# Altium PCB IC Power SimCom.PcbDoc (part 1 of 3)
Units mm, origin at the board's own origin, x right, y up, seen from the top; angles counter-clockwise.
Board outline 110 x 110 mm, 2 copper layers (Top Layer, Bottom Layer); 161 components, 109 nets, 599 pads, 845 vias.
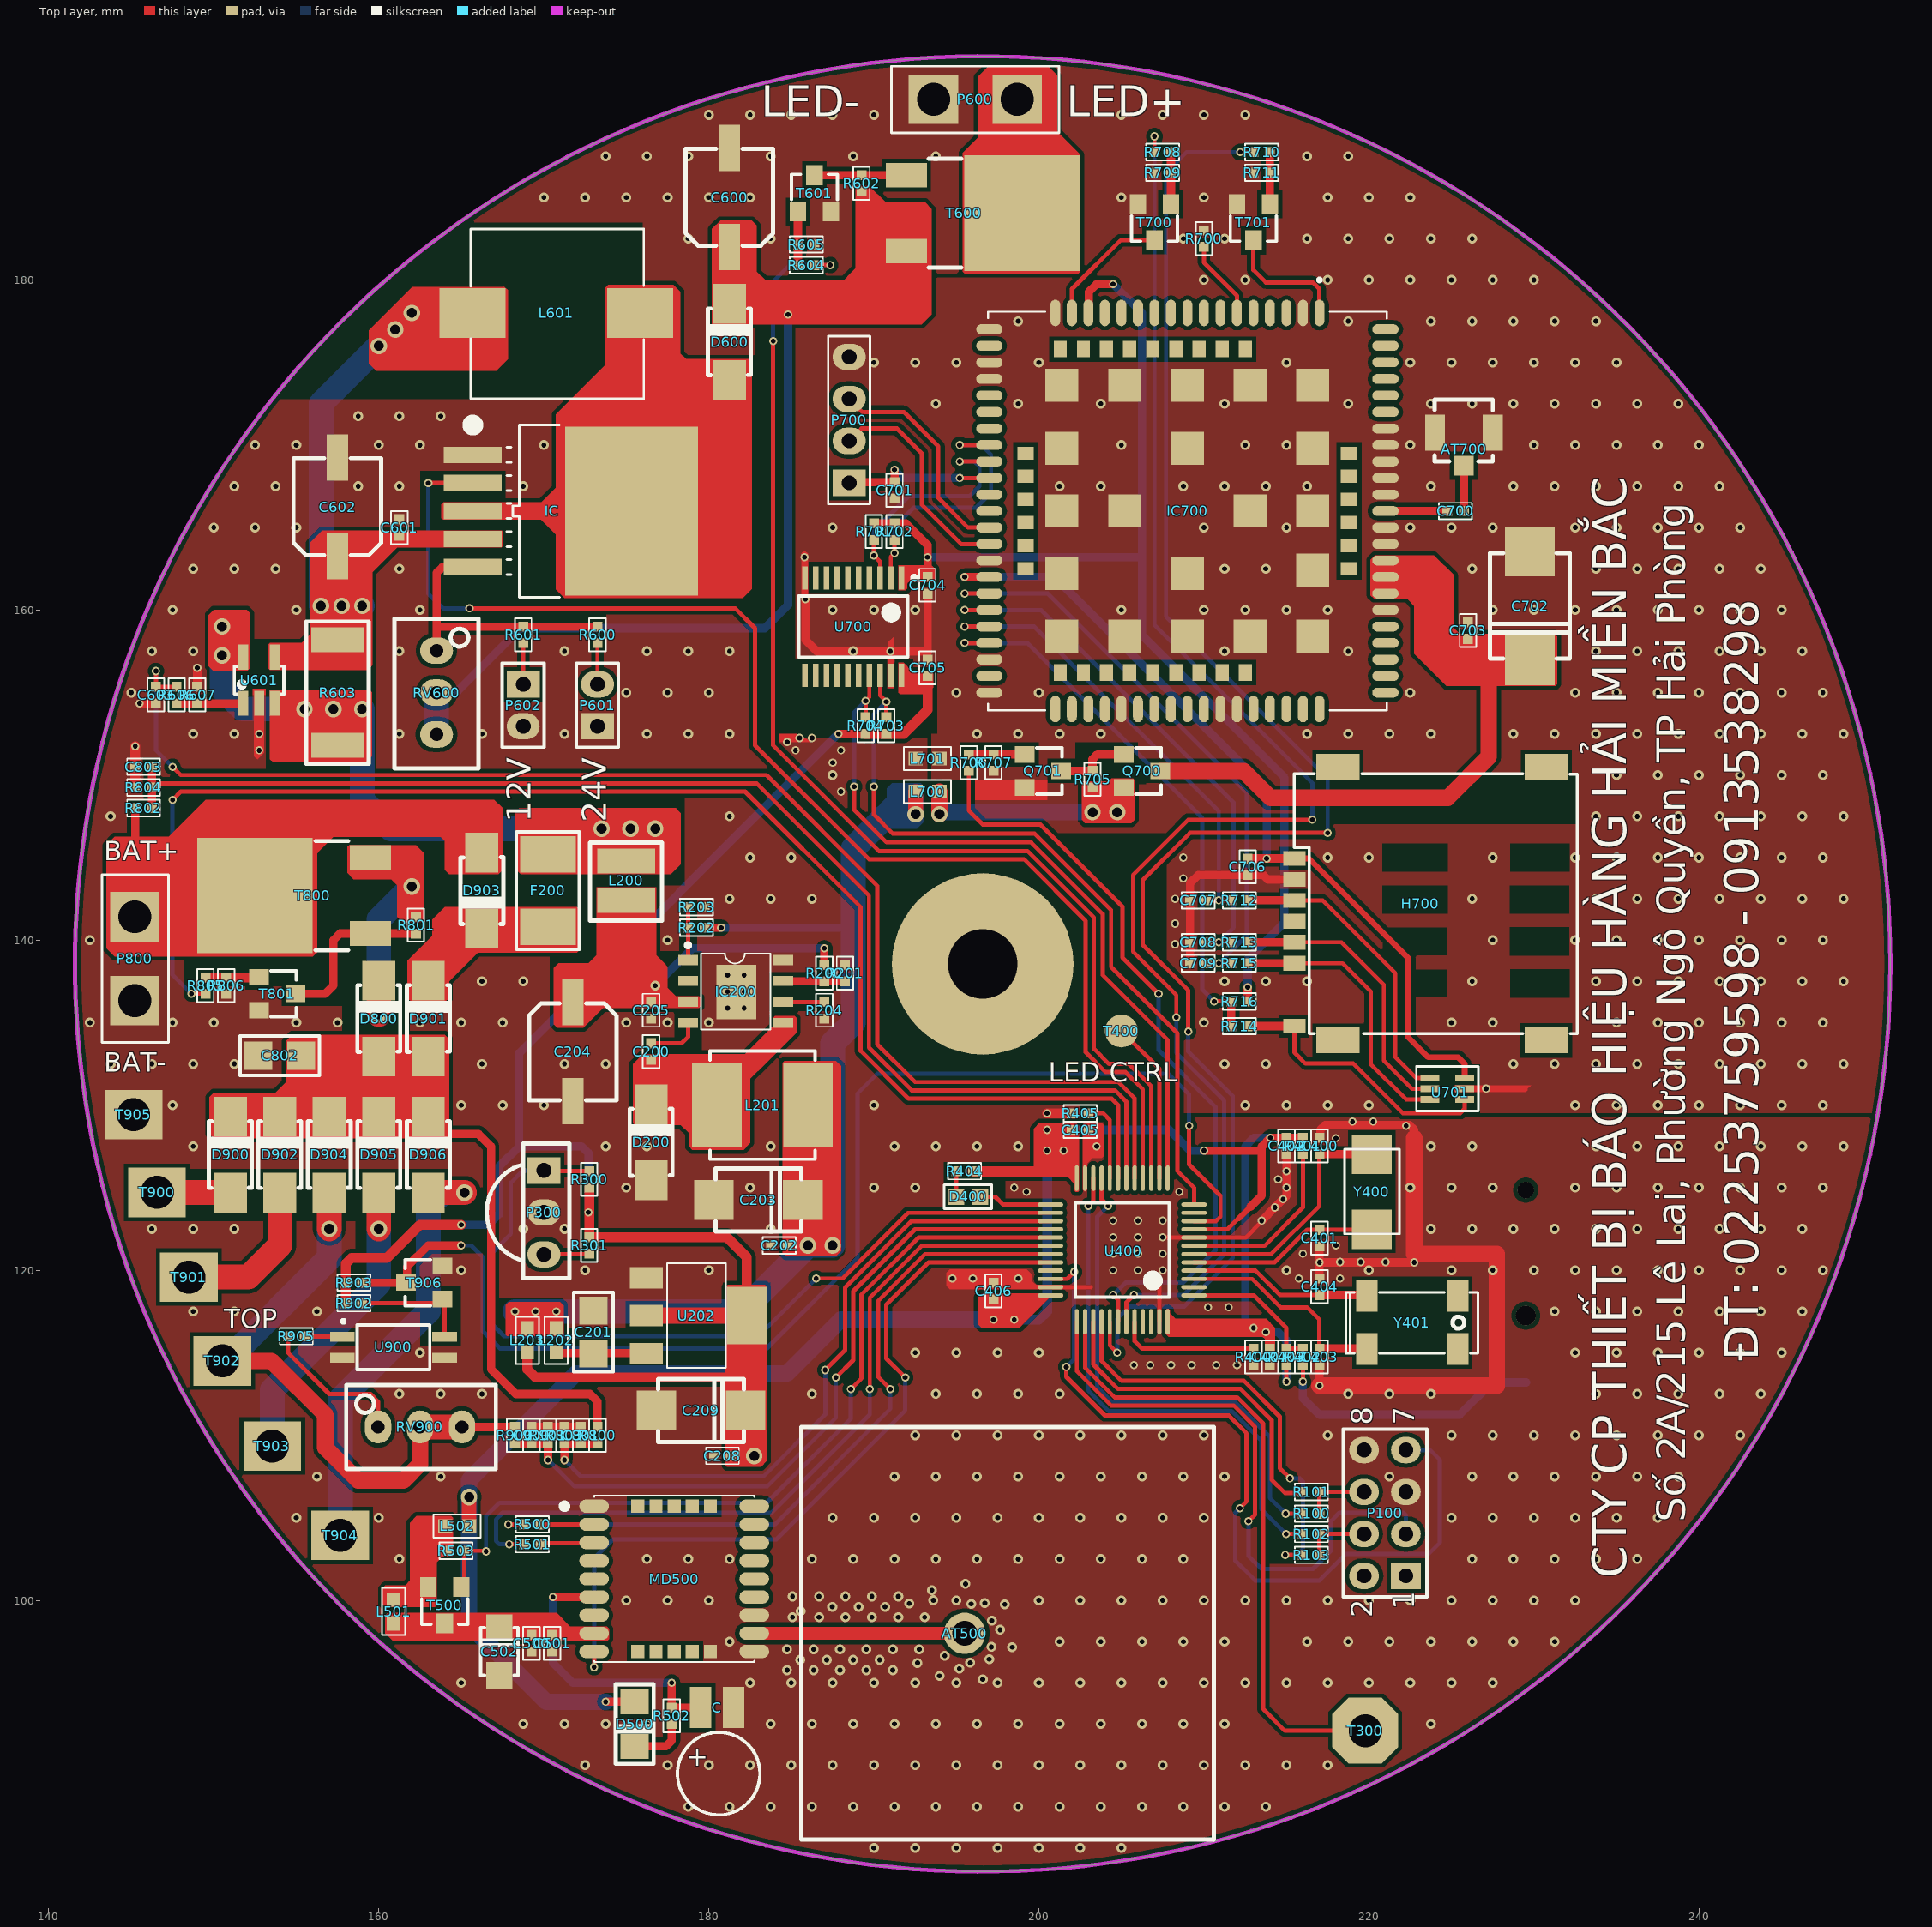
[diagram p0: Top Layer view]
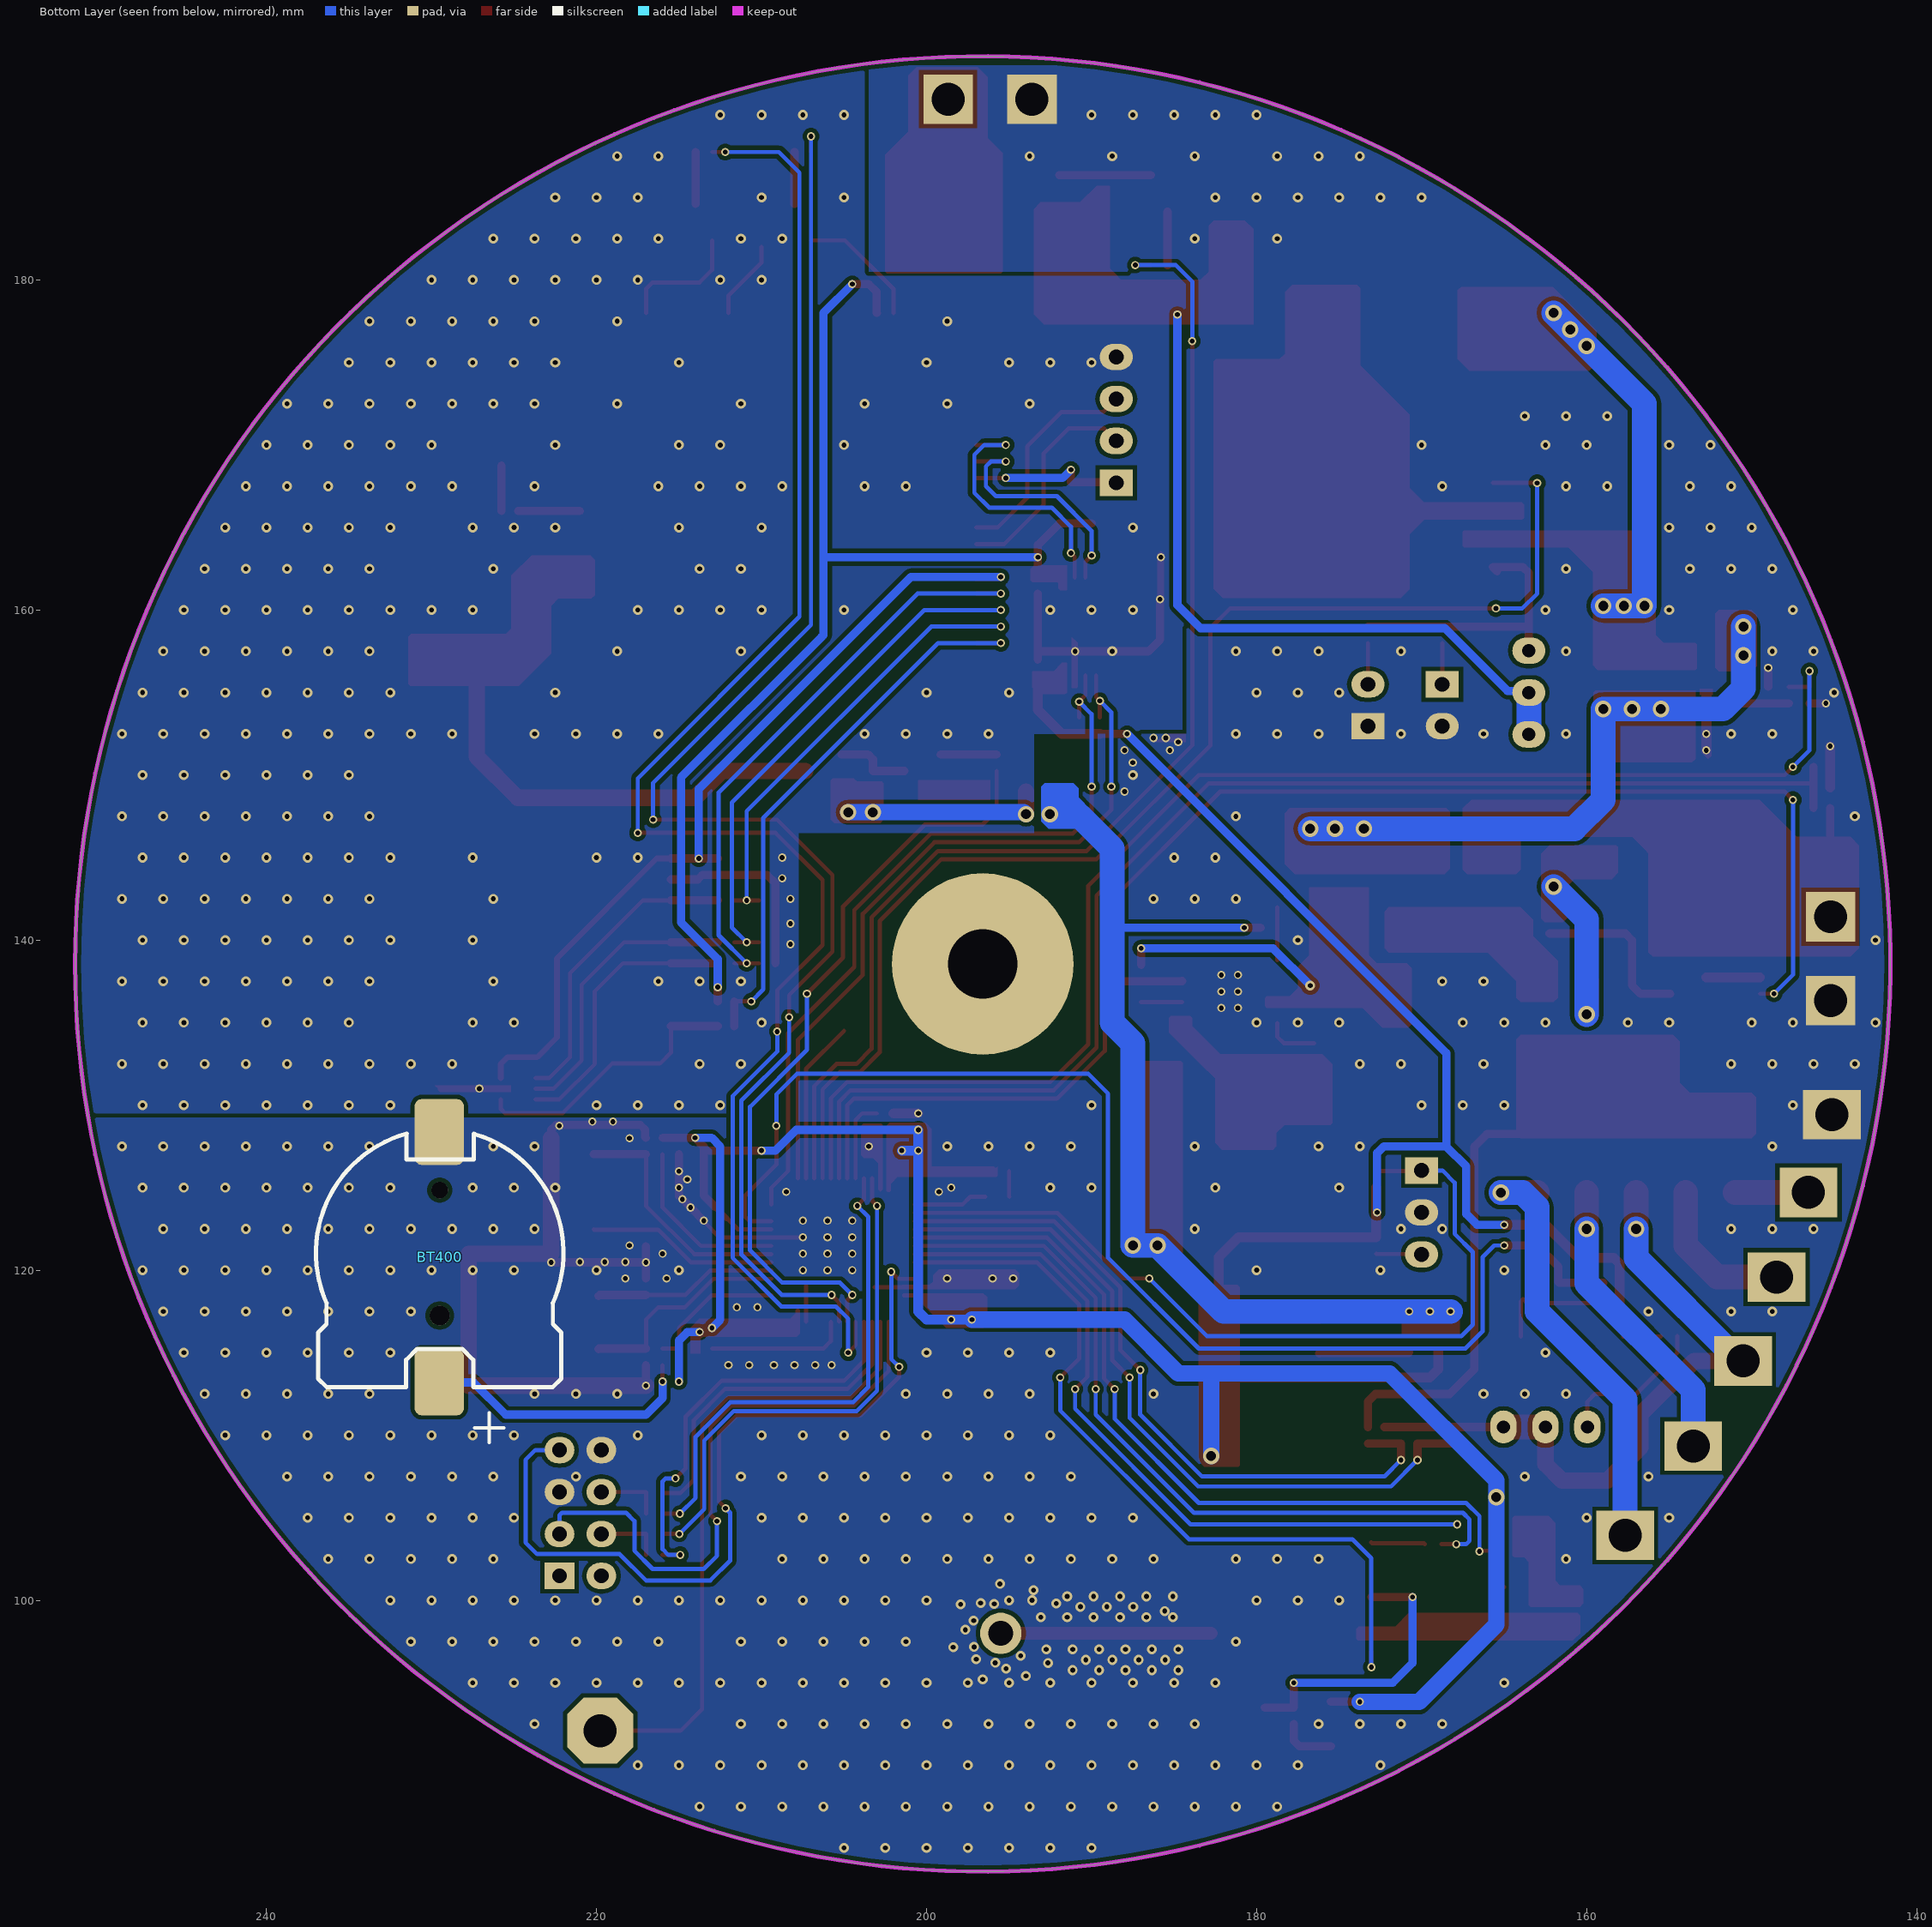
[diagram p1: Bottom Layer view, seen from below]
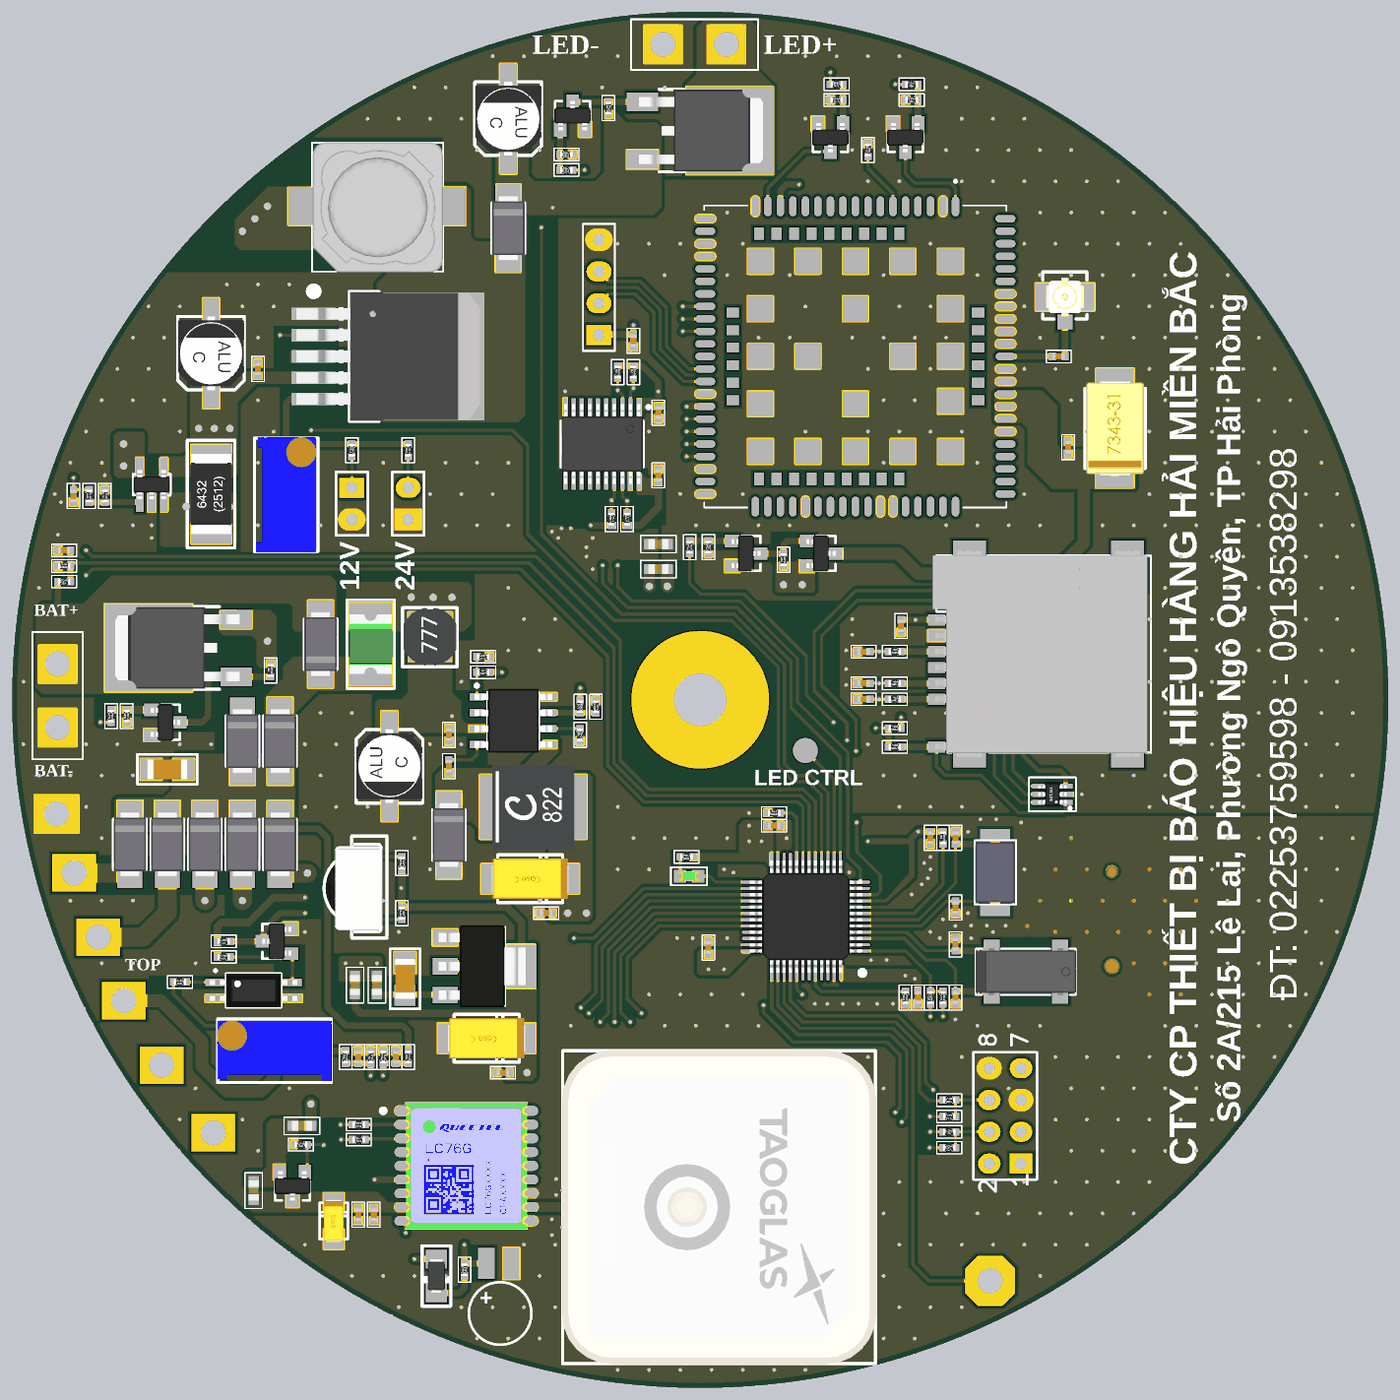
[diagram p3: 3D render of the assembled board from above, using the file's embedded part models]

## Layer stack, top to bottom
Top Solder: solder mask 0.0102, Solder Resist, Dk 3.5
Top Layer: signal copper 0.0356
Dielectric 1: dielectric 0.32, FR-4, Dk 4.8
Bottom Layer: signal copper 0.0356
Bottom Solder: solder mask 0.0102, Solder Resist, Dk 3.5

## Board outline
141.596,138.557 ccw(c196.596,138.557) 196.596,83.557 ccw(c196.596,138.557) 251.596,138.557 ccw(c196.596,138.557) 196.596,193.557 ccw(c196.596,138.557)

## Design rules (kind name [scope] priority, off if disabled: settings)
Clearance [not InComponent('U400','U701')] p1: gap=0.254 ignorepadtopadclearanceinfootprint=FALSE
ComponentClearance [All] p1: gap=0 collisioncheckmode=3 verticalgap=0 showdistances=FALSE
HoleSize [All] p1: absolutevalues=TRUE maxlimit=10 minlimit=0.025 maxpercent=80.000 minpercent=20.000
PlaneConnect [All] p1: planeconnectstyle=Direct reliefexpansion=0.508 reliefentries=4 reliefconductorwidth=0.254 reliefairgap=0.254
PolygonConnect [All] p1: connectstyle=Direct reliefconductorwidth=0.254 reliefentries=4 polygonreliefangle="90 Angle" airgapwidth=0.254
RoutingVias [All] p1: holewidth=0.4 width=8 viastyle="Through Hole" minholewidth=0.3 minwidth=0.6 maxholewidth=0.5 maxwidth=1
SilkToSilkClearance [All] p1: silktosilkclearance=0
SilkToSolderMaskClearance [IsPad] p1: minsilkscreentomaskgap=0 clearancetoexposedcopper=TRUE
SolderMaskExpansion [All] p1: expansion=0.102 istentingtop=FALSE
Width [All] p1: maxlimit=1.5 minlimit=0.254 preferedwidth=0.5
25 further rules are at their usual default settings.

## Classes and differential pairs
net class 50Ohm: NetAT500_1
component class HMS.Bootloader: P100 R100 R101 R102 R103
component class U_HMS.LC76G: AT500 C C500 C501 C502 D500 L501 L502 MD500 R500 R501 R502 R503 T500
component class HMS.LedCtrl: C600 C601 C602 C603 D600 IC L601 P600 P601 P602 R600 R601 R602 R603 R604 R605 R606 R607 RV600 T600 T601 U601
component class HMS.Power: C200 C201 C202 C203 C204 C205 C208 C209 D200 F200 IC200 L200 L201 L202 L203 R200 R201 R202 R203 R204 U202
component class HMS.STM32L151CBT6: BT400 C400 C401 C402 C403 C404 C405 C406 C407 D400 R400 R401 R402 R403 R404 R405 T400 U400 Y400 Y401
component class U_HMS.SIM.A7677S: AT700 C700 C701 C702 C703 C704 C705 C706 C707 C708 C709 H700 IC700 L700 L701 P700 Q700 Q701 R700 R701 R702 R703 R704 R705 R706 R707 R708 R709 R710 R711 R712 R713 R714 R715 R716 T700 T701 U700 U701
component class HMS_NiMHCharge: C801 C802 C803 D800 P800 R800 R801 R802 R803 R804 R805 R806 T800 T801
component class HMS_Solar: C900 D900 D901 D902 D903 D904 D905 D906 R900 R901 R902 R903 R905 RV900 T900 T901 T902 T903 T904 T905 T906 U900
component class HMS.VS1838B: P300 R300 R301 T300

## Components (designator, comment, footprint, x,y, rotation, side; value= is the part's Value field where it differs from the comment)
AT500 "Antenna GPS" "ANT GPS Passive" 195.5,98 r180 top
AT700 "IPEX" "IPEX SMD" 225.75,168.75 r270 top value=NC
BT400 "NC" "DE PIN NHO 3V3" 229.5,121.05 r270 bottom locked
C "NC" SPCAP0.22F 180.5,93.5 r180 top (schematic designator C503)
C200 "104/50V" CAP_CERAMIC_0402(1005) 176.5,133.25 r90 top
C201 "106/50V" CAP_CERAMIC_1206(3216-18) 173,116.25 r270 top
C202 "104/50V" CAP_CERAMIC_0402(1005) 184.275,121.5 r0 top
C203 "107/10V" CAP_TANTAL_2312(6032-28) 183,124.25 r180 top
C204 "10uF/50V" CAP_ALUM_SMD_5054_TYPE_C 171.75,133.25 r90 top
C205 "104/50V" CAP_CERAMIC_0402(1005) 176.5,135.75 r90 top
C208 "104/50V" CAP_CERAMIC_0402(1005) 180.825,108.75 r0 top
C209 "107/10V" CAP_TANTAL_2312(6032-28) 179.525,111.5 r180 top
C400 "20pF/50V" CAP_CERAMIC_0402(1005) 217,127.525 r270 top
C401 "20pF/50V" CAP_CERAMIC_0402(1005) 217,121.95 r90 top
C402 "104/50V" CAP_CERAMIC_0402(1005) 215,127.525 r90 top
C403 "10pF/50V" CAP_CERAMIC_0402(1005) 217,114.75 r90 top
C404 "10pF/50V" CAP_CERAMIC_0402(1005) 217,119 r270 top
C405 "104/50V" CAP_CERAMIC_0402(1005) 202.5,128.5 r180 top
C406 "104/50V" CAP_CERAMIC_0402(1005) 197.25,118.75 r270 top
C407 "104/50V" CAP_CERAMIC_0402(1005) 214,114.75 r90 top
C500 "104/50V" CAP_CERAMIC_0402(1005) 169.25,97.4 r90 top
C501 "10pF/50V" CAP_CERAMIC_0402(1005) 170.5,97.4 r90 top
C502 "107/10V" CAP_TANTAL_1206(3216-18) 167.3,96.9 r270 top
C600 "10uF/50V" CAP_ALUM_SMD_5054_TYPE_C 181.25,185 r270 top
C601 "104/50V" CAP_CERAMIC_0402(1005) 161.25,165 r270 top
C602 "10uF/50V" CAP_ALUM_SMD_5054_TYPE_C 157.5,166.25 r270 top
C603 "104/50V" CAP_CERAMIC_0402(1005) 146.5,154.85 r90 top
C700 "NC" CAP_CERAMIC_0402(1005) 225.25,166 r180 top
C701 "NC" CAP_CERAMIC_0402(1005) 191.25,167.25 r270 top value=104/50V
C702 "NC" CAP_TANTAL_2917(7343-31) 229.75,160.25 r90 top value=477/10V
C703 "NC" CAP_CERAMIC_0402(1005) 226,158.75 r270 top value=104/50V
C704 "NC" CAP_CERAMIC_0402(1005) 193.25,161.5 r90 top
C705 "NC" CAP_CERAMIC_0402(1005) 193.25,156.5 r270 top
C706 "NC" CAP_CERAMIC_0402(1005) 212.65,144.447 r90 top value=104/50V
C707 "NC" CAP_CERAMIC_0402(1005) 209.65,142.407 r0 top value=20pF/50V
C708 "NC" CAP_CERAMIC_0402(1005) 209.65,139.867 r0 top value=20pF/50V
C709 "NC" CAP_CERAMIC_0402(1005) 209.65,138.597 r0 top value=20pF/50V
C801 "104/50V" CAP_CERAMIC_0402(1005) 172.25,110 r270 top
C802 "106/50V" CAP_CERAMIC_1206(3216-18) 154,133 r180 top
C803 "104/50V" CAP_CERAMIC_0402(1005) 145.75,150.5 r0 top
C900 "104/50V" CAP_CERAMIC_0402(1005) 169.25,110 r270 top
D200 "SS34" DO214AC_SMA_1808 176.5,127.75 r90 top
D400 "LED Red" LED_0603_GREEN 195.7,124.45 r0 top
D500 "1N4148W" DIODE_F03_1005 175.5,92.5 r270 top
D600 "SS54" DO214AC_SMA_1808 181.25,176.25 r90 top
D800 "SS34" DO214AC_SMA_1808 160,135.25 r90 top
D900 "SS34" DO214AC_SMA_1808 151,127 r90 top
D901 "SS34" DO214AC_SMA_1808 163,135.25 r90 top
D902 "SS34" DO214AC_SMA_1808 154,127 r90 top
D903 "SS34" DO214AC_SMA_1808 166.25,143 r270 top
D904 "SS34" DO214AC_SMA_1808 157,127 r90 top
D905 "SS34" DO214AC_SMA_1808 160,127 r90 top
D906 "SS34" DO214AC_SMA_1808 163,127 r90 top
F200 "1A/33V" MF-MSMF 170.25,143 r90 top
H700 "NC" MUP-C792 223.116,142.212 r90 top value=MUP-C792
IC "XL6019E1" TO-263-5 170.5,166 r270 top
IC200 "RY81020BP8" ESOP-8 181.633,136.885 r270 top
IC700 "NC" SIM_A7677S 209,166 r270 top locked
L200 "3.3uH" L2.1A_3.5_3.3 175,143.6 r180 top
L201 "33uH" L3A_7x7x3mm 183.25,130 r0 top
L202 "FBMJ1608HM230NT" Inductor_0603 170.75,115.75 r270 top
L203 "FBMJ1608HM230NT" Inductor_0603 169,115.75 r270 top
L501 "4A/23Ohm" Inductor_0603 160.9,99.323 r270 top
L502 "NC" Inductor_0603 164.75,104.5 r180 top
L601 "4.7uH" L3A_10x10x4mm 170.75,178 r0 top
L700 "NC" Inductor_0603 193.25,149 r0 top
L701 "NC" Inductor_0603 193.25,151 r0 top
MD500 "LC76G" LC76G_GPS 173.05,105.7 r0 top
P100 "Header 4X2" HDR2X4 222.24,101.48 r90 top
P300 "VS1838B" IR_RECEIVER 170,123.5 r270 top
P600 "NC" H2_BIG 196.15,190.95 r180 top
P601 "24V" HDR1X2 173.25,154.23 r90 top
P602 "12V" HDR1X2 168.75,154.23 r270 top
P700 "NC" HDR1X4 188.5,171.52 r90 top
P800 "NC" H2_BIG 145.225,138.875 r270 top
Q700 "NC" SOT23-3 206.25,150.25 r270 top value="20 V 4A"
Q701 "NC" SOT23-3 200.25,150.25 r270 top value="0.15A 60V SOT-23"
R100 "1K" RES_0402(1005) 216.5,105.25 r180 top
R101 "NC" RES_0402(1005) 216.5,106.56 r180 top
R102 "1K" RES_0402(1005) 216.5,104.02 r180 top
R103 "NC" RES_0402(1005) 216.5,102.75 r180 top
R200 "NC" RES_0402(1005) 187,138 r90 top
R201 "NC" RES_0402(1005) 188.25,138 r270 top
R202 "20K" RES_0402(1005) 179.25,140.75 r0 top
R203 "5.1K" RES_0402(1005) 179.25,142 r180 top
R204 "NC" RES_0402(1005) 187,135.75 r90 top
R300 "10K" RES_0402(1005) 172.75,125.5 r270 top
R301 "100R" RES_0402(1005) 172.75,121.5 r270 top
R400 "100K" RES_0402(1005) 213,114.75 r90 top
R401 "100K" RES_0402(1005) 216,127.525 r90 top
R402 "NC" RES_0402(1005) 216,114.75 r90 top
R403 "0R" RES_0402(1005) 215,114.75 r90 top
R404 "1K" RES_0402(1005) 195.5,126 r180 top
R405 "100K" RES_0402(1005) 202.5,129.5 r0 top
R500 "1K" RES_0402(1005) 169.3,104.6 r180 top
R501 "1K" RES_0402(1005) 169.3,103.4 r180 top
R502 "100R" RES_0402(1005) 177.75,93 r270 top
R503 "10K" RES_0402(1005) 164.675,103 r180 top
R600 "5.1K" RES_0402(1005) 173.25,158.5 r90 top
R601 "10K" RES_0402(1005) 168.75,158.5 r90 top
R602 "10K" RES_0402(1005) 189.25,185.85 r270 top
R603 "0.1R" RES_2512 157.5,155 r90 top
R604 "1K" RES_0402(1005) 185.9,180.9 r180 top
R605 "10K" RES_0402(1005) 185.9,182.15 r180 top
R606 "330R" RES_0402(1005) 147.75,154.85 r90 top
R607 "100K" RES_0402(1005) 149,154.85 r270 top
R700 "NC" RES_0402(1005) 210,182.5 r270 top value=1K
R701 "NC" RES_0402(1005) 190,164.75 r90 top value=2K2
R702 "NC" RES_0402(1005) 191.25,164.75 r90 top value=2K2
R703 "NC" RES_0402(1005) 190.75,153 r270 top value=2K2
R704 "NC" RES_0402(1005) 189.5,153 r270 top value=2K2
R705 "NC" RES_0402(1005) 203.25,149.75 r90 top
R706 "NC" RES_0402(1005) 195.75,150.75 r270 top
R707 "NC" RES_0402(1005) 197.25,150.75 r270 top
R708 "NC" RES_0402(1005) 207.5,187.75 r180 top
R709 "NC" RES_0402(1005) 207.5,186.5 r180 top
R710 "NC" RES_0402(1005) 213.5,187.75 r180 top
R711 "NC" RES_0402(1005) 213.5,186.5 r180 top
R712 "NC" RES_0402(1005) 212.15,142.407 r0 top value=0R
R713 "NC" RES_0402(1005) 212.15,139.867 r0 top value=0R
R714 "NC" RES_0402(1005) 212.15,134.787 r0 top value=0R
R715 "NC" RES_0402(1005) 212.15,138.597 r0 top value=0R
R716 "NC" RES_0402(1005) 212.15,136.287 r0 top value=4.7K
R800 "100K" RES_0402(1005) 173.25,110 r90 top
R801 "10K" RES_0402(1005) 162.25,140.9 r90 top
R802 "100K" RES_0402(1005) 145.75,148 r180 top
R803 "10K" RES_0402(1005) 171.25,110 r270 top
R804 "10K" RES_0402(1005) 145.75,149.25 r0 top
R805 "1K" RES_0402(1005) 149.5,137.25 r90 top
R806 "10K" RES_0402(1005) 150.75,137.25 r90 top
R900 "100K" RES_0402(1005) 168.25,110 r90 top
R901 "10K" RES_0402(1005) 170.25,110 r270 top
R902 "10K" RES_0402(1005) 158.5,118 r180 top
R903 "10K" RES_0402(1005) 158.5,119.25 r180 top
R905 "10K" RES_0402(1005) 155,116 r180 top
RV600 "204" RES_VAR_Type1 163.5,155 r270 top
RV900 "104" RES_VAR_Type1 162.5,110.5 r0 top
T300 "Test Point" TP 219.775,92.1 r0 top
T400 "Test Point" "Test Point SMD" 205,134.5 r90 top
T500 "A03415" SOT23-3 164,99.7 r180 top value=AO3415
T600 "AOD409" TO252 197.5,184.05 r270 top
T601 "C1815" SOT23-3 186.4,185.25 r0 top
T700 "NC" SOT23-3 207,183.5 r180 top value="0.15A 60V SOT-23"
T701 "NC" SOT23-3 213,183.5 r180 top value="0.15A 60V SOT-23"
T800 "AOD409" TO252 153.968,142.7 r90 top
T801 "C1815" SOT23-3 153.85,136.75 r270 top
T900 "Test Point" TP_2 146.558,124.714 r180 top
T901 "Test Point" TP_2 148.488,119.583 r180 top
T902 "Test Point" TP_2 150.52,114.503 r180 top
T903 "Test Point" TP_2 153.543,109.347 r180 top
T904 "Test Point" TP_2 157.671,103.937 r180 top
T905 "Test Point" TP_2 145.15,129.425 r180 top
T906 "2N7002,215" SOT23-3 162.75,119.25 r90 top value="60V 300mA"
U202 "LM1117-ADJ" LM1117-SOP 179.25,117.25 r270 top value=3.3V
U400 "STM32L151CBT6" LQFP48_L 205.05,121.225 r180 top
U601 "INA138" SOT23-5 152.75,155.75 r0 top
U700 "NC" TSOP65P640X120-20N 188.75,159 r270 top
U701 "NC" SOT65P210X140-6N 224.75,131 r180 top
U900 "EL817" "Opto small" 161.25,115.5 r0 top value="60V 50mA"
Y400 "8Mhz" CRYSTAL_SMD_2PIN-5032 220.175,124.75 r90 top
Y401 "32.768KHz" ABS25-32768-6-T 222.625,116.825 r0 top

## Footprints (in the part's own frame and the unit in brackets; to place one, negate y for a bottom-side part, rotate by r counter-clockwise, add the part's x,y. Pads: shape width x height; smd on the part's side, far side on the other; paste and mask are expansions set on the pad)
ABS25-32768-6-T [mm] "CRYSTAL 32.768KHZ 6PF SMD"
  rect 1.3x1.9 smd: 1(-2.75,-1.6) 2(2.75,-1.6) 3(2.75,1.6) 4(-2.75,1.6)
  silkscreen extent -4.02,-1.85 3.98,1.83, body extent -4,-1.9 4,1.9, height 2.53
"ANT GPS Passive" [mm]
  round 2.5 hole 1.5: 1(0,0)
  silkscreen extent -15.1,-12.5 9.9,12.5, body extent -15.15,-12.55 9.95,12.55, height 4.73
CAP_ALUM_SMD_5054_TYPE_C [mm]
  rect 2.8x1.3 smd: 1(3,0) 2(-3,0)
  silkscreen extent -2.95,-2.67 2.92,2.65, body extent -2.95,-2.65 2.95,2.65, height 5.41
CAP_CERAMIC_0402(1005) [mm] "Chip Inductor, Body 1.0x0.5mm, IPC High Density"
  rect 0.6x0.6 smd: 1(-0.5,0) 2(0.5,0)
  silkscreen extent -1,-0.5 1,0.5, body extent -0.5,-0.25 0.5,0.25, height 0.5
CAP_CERAMIC_1206(3216-18) [mm] "Chip Capacitor, Body 3.2x1.6mm, IPC High Density"
  rect 1.7x1.7 smd: 1(-1.3,0) 2(1.3,0)
  silkscreen extent -2.4,-1.2 2.4,1.2, body extent -1.6,-0.8 1.6,0.8, height 1
CAP_TANTAL_1206(3216-18) [mm] "Chip Capacitor, Body 3.2x1.6mm, IPC High Density"
  rect 1.6x1.6 smd: 1(-1.45,0) 2(1.45,0)
  silkscreen extent -1.45,-1.12 1.45,1.12, body extent -1.7,-0.8 1.7,0.8, height 1.65
CAP_TANTAL_2312(6032-28) [mm] "Chip Resistor, Body 6.0x3.2mm, IPC High Density"
  rect 2.4x2.4 smd: 1(-2.7,0) 2(2.7,0)
  silkscreen extent -2.6,-1.91 2.6,1.91, body extent -3.09,-1.6 3.09,1.6, height 2.69
CAP_TANTAL_2917(7343-31) [mm] "Chip Resistor, Body 6.0x3.2mm, IPC High Density"
  rect 3x3 smd: 1(-3.3,0) 2(3.3,0)
  silkscreen extent -3.2,-2.41 3.2,2.41, body extent -3.8,-2.3 3.8,2.3, height 3.1
CRYSTAL_SMD_2PIN-5032 [mm] "Crystal smd"
  rect 2.4x2.4 smd mask+0.025: 1(-2.275,0) 2(2.275,0)
  silkscreen extent -2.55,-1.67 2.58,1.65, body extent -2.5,-1.6 2.5,1.6, height 1.3
"DE PIN NHO 3V3" [mm]
  rrect30% 4x3 smd mask+0.051: 1(7.85,-0.025) 2(-7.325,-0.025)
  round 1 hole 1 unplated paste+0 mask+0: ""(-3.8,0)
  round 1.2 hole 1.2 unplated mask+0: ""(3.8,0)
  silkscreen extent -7.23,-7.5 11.5,7.5, body extent -9,-7.5 9.5,7.49, height 3.92
DIODE_F03_1005 [mm]
  rect 1.5x1.7 smd: 1(-1.35,0) 2(1.35,0)
  silkscreen extent -2.4,-1.14 2.41,1.16, body extent -1.35,-0.7 1.35,0.7, height 0.73
DO214AC_SMA_1808 [mm] "Diode B340, Diode M7"
  rect 2.4x2 smd: 1(-2.3,0) 2(2.3,0)
  silkscreen extent -2.02,-1.3 2.02,1.3, body extent -2.6,-1.3 2.6,1.3, height 2.42
ESOP-8 [mm]
  rect 0.6x1.2 smd: 1(-1.905,-2.883) 2(-0.635,-2.883) 3(0.635,-2.883) 4(1.905,-2.883) 5(1.905,2.884) 6(0.635,2.884) 7(-0.635,2.884) 8(-1.905,2.884)
  rect 3.3x2.4 smd: 9(0.035,0.034)
  silkscreen extent -2.9,-3 2.3,2.1, body extent -2.54,-3.07 2.56,3.13, height 1.56
H2_BIG [mm] "Euro Block"
  rect 3x3 hole 2: 1(-2.54,0) 2(2.54,0)
  silkscreen extent -5.08,-2 5.08,2.03, body extent -3.81,-1.27 3.81,1.27, height 1.5
HDR1X2 [mm] "Connector; Header; 2 Position"
  rect 1.6x2 hole 0.9: 1(-1.27,0)
  oval 1.6x2 hole 0.9: 2(1.27,0)
  silkscreen extent -2.54,-1.27 2.54,1.27, body extent -2.54,-1.27 2.54,1.27, height 7
HDR1X4 [mm] "Connector; Header; 4 Position"
  rect 1.6x2 hole 0.9: 1(-3.81,0)
  oval 1.6x2 hole 0.9: 2(-1.27,0) 3(1.27,0) 4(3.81,0)
  silkscreen extent -5.08,-1.27 5.08,1.27, body extent -5.08,-1.27 5.08,1.27, height 7
HDR2X4 [mm] "Connector; Header; 4x2 Position"
  rect 1.6x1.8 hole 0.9: 1(0,0)
  oval 1.6x1.8 hole 0.9: 2(0,2.54) 3(2.54,0) 4(2.54,2.54) 5(5.08,0) 6(5.08,2.54) 7(7.62,0) 8(7.62,2.54)
  silkscreen extent -1.27,-1.27 8.89,3.81, body extent -1.27,-1.27 8.89,3.81, height 7
Inductor_0603 [mil] "HK1608R22J-T"
  rect 34x32 smd paste+0 mask+0: 1(-28.54,0) 2(28.46,0)
  silkscreen extent -56,-28 56,28, body extent -32,-16 31,16, height 37
"IPEX SMD" [mm] "IPEX Connector SMD"
  rect 1.2x1.2 smd: 1(0,0)
  rect 2.2x1.2 smd: 2(-2,1.75) 2(-2,-1.75)
  silkscreen extent -4,-1.78 -0.25,1.75, body extent -3.55,-1.5 -0.45,1.5, height 1.25
IR_RECEIVER [mm] "TO, Flat Index; 3 In-Line, Axial Leads; Body Dia. 4.8mm; Leads 0.55 x 0.51 mm (max)"
  rect 1.6x2 hole 0.9: 1(-2.54,0)
  oval 1.6x2 hole 0.9: 2(0,0) 3(2.54,0)
  silkscreen extent -4.17,-3.46 3.99,1.55, body extent -3.62,-3.6 3.62,1.2, height 8.8
L2.1A_3.5_3.3 [mm]
  rect 3.5x1.5 smd: 1(0,-1.2) 2(0,1.2)
  silkscreen extent -2.16,-2.31 2.21,2.41, body extent -2.1,-2.31 2.1,2.31, height 3.47
L3A_7x7x3mm [mm]
  rect 3x5.12 smd: 1(-2.764,0) 2(2.764,0)
  silkscreen extent -3.18,-3.28 3.18,3.28, body extent -3.28,-3.38 3.28,3.38, height 6.1
L3A_10x10x4mm [mm]
  rect 4x3 smd: 1(-5.08,0) 2(5.08,0)
  silkscreen extent -5.18,-5.21 5.31,5.08, body extent -5.12,-5.28 5.28,5.12, height 6.25
LC76G_GPS [mm] "Modlue GNSS"
  rrect100% 1.8x0.8 smd mask+0.05: 1(0,0) 2(0,-1.1) 3(0,-2.2) 4(0,-3.3) 5(0,-4.4) 6(0,-5.5) 7(0,-6.6) 8(0,-7.7) 9(0,-8.8) 10(9.7,-8.8) 11(9.7,-7.7) 12(9.7,-6.6) 13(9.7,-5.5) 14(9.7,-4.4) 15(9.7,-3.3) 16(9.7,-2.2) 17(9.7,-1.1) 18(9.7,0)
  rect 0.8x0.8 smd mask+0.05: 19(7.05,0) 20(5.95,0) 21(4.85,0) 22(3.75,0) 23(2.65,0) 24(2.65,-8.8) 25(3.75,-8.8) 26(4.85,-8.8) 27(5.95,-8.8) 28(7.05,-8.8)
  silkscreen extent -1.9,-9.45 9.7,0.65, body extent 0,-9.45 9.7,0.65, height 2.4
LED_0603_GREEN [mm] "Chip Capacitor, Body 1.6x0.8mm, IPC High Density"
  rect 1x1 smd: 1(-0.725,0) 2(0.725,0)
  silkscreen extent -1.45,-0.73 1.45,0.72, body extent -0.8,-0.4 0.8,0.4, height 0.6
LM1117-SOP [mm]
  rect 1.3x2 smd: 1(-2.3,-3.048) 2(0,-3.048) 3(2.3,-3.048)
  rect 3.5x2.4 smd: 2(0,3.048)
  silkscreen extent -3.18,-1.78 3.18,1.78, body extent -3.25,-3.56 3.25,3.4, height 1.68
LQFP48_L [mm] "Thin QFP, 48-Leads, Body 7x7mm, Pitch 0.5mm, IPC High Density"
  round 0.8 on Top Overlay: 0(-4.5,4.5)
  oval 1.55x0.25 smd: 1(-4.35,2.75) 2(-4.35,2.25) 3(-4.35,1.75) 4(-4.35,1.25) 5(-4.35,0.75) 6(-4.35,0.25) 7(-4.35,-0.25) 8(-4.35,-0.75) 9(-4.35,-1.25) 10(-4.35,-1.75) 11(-4.35,-2.25) 12(-4.35,-2.75) 25(4.35,-2.75) 26(4.35,-2.25) 27(4.35,-1.75) 28(4.35,-1.25) 29(4.35,-0.75) 30(4.35,-0.25) 31(4.35,0.25) 32(4.35,0.75) 33(4.35,1.25) 34(4.35,1.75) 35(4.35,2.25) 36(4.35,2.75)
  oval 0.25x1.55 smd: 13(-2.75,-4.35) 14(-2.25,-4.35) 15(-1.75,-4.35) 16(-1.25,-4.35) 17(-0.75,-4.35) 18(-0.25,-4.35) 19(0.25,-4.35) 20(0.75,-4.35) 21(1.25,-4.35) 22(1.75,-4.35) 23(2.25,-4.35) 24(2.75,-4.35) 37(2.75,4.35) 38(2.25,4.35) 39(1.75,4.35) 40(1.25,4.35) 41(0.75,4.35) 42(0.25,4.35) 43(-0.25,4.35) 44(-0.75,4.35) 45(-1.25,4.35) 46(-1.75,4.35) 47(-2.25,4.35) 48(-2.75,4.35)
  silkscreen extent -2.85,-2.85 2.85,2.85, body extent -4.5,-4.5 4.5,4.5, height 1.6
MF-MSMF [mm]
  rect 2.2x3.4 smd: 1(-2.2,0) 2(2.2,0)
  silkscreen extent -3.56,-1.91 3.56,1.91, body extent -2.36,-1.74 2.37,1.74, height 1.03
MUP-C792 [mm]
  rect 0.9x1.35 smd: 1(2.735,7.634) 2(0.195,7.634) 3(-2.345,7.634) 5(1.465,7.634) 6(-1.075,7.634) 7(-3.615,7.634) 8(-7.425,7.634)
  rect 1.56x2.61 smd: MP(-8.288,-7.634) MP(-8.288,4.996) MP(8.288,-7.634) MP(8.288,4.996)
  Top Layer pour cut-out: -3.147,-9.017 -3.147,-5.436 -1.445,-5.436 -1.445,-9.017
  Top Layer pour cut-out: -0.607,-9.017 -0.607,-5.436 1.095,-5.436 1.095,-9.017
  Top Layer pour cut-out: 1.933,-9.042 1.933,-5.461 3.635,-5.461 3.635,-9.042
  Top Layer pour cut-out: -5.69,-9.042 -5.69,-5.461 -3.988,-5.461 -3.988,-9.042
  Top Layer pour cut-out: -5.69,-1.651 -5.69,2.286 -3.988,2.286 -3.988,-1.651
  Top Layer pour cut-out: -3.147,-1.651 -3.147,2.286 -1.445,2.286 -1.445,-1.651
  Top Layer pour cut-out: -0.607,-1.651 -0.607,2.286 1.095,2.286 1.095,-1.651
  Top Layer pour cut-out: 1.933,-1.651 1.933,2.286 3.635,2.286 3.635,-1.651
  Top Layer pour cut-out: 4.801,-9.449 4.801,7.569 7.866,7.569 7.866,-9.449
  silkscreen extent -7.87,-9.51 7.87,7.65, body extent -8.26,-9.22 8.25,7.95, height 1.5
"Opto small" [mm]
  rect 1.5x0.6 smd: 1(-3.454,0.468) 2(-3.454,-0.802) 3(2.746,-0.802) 4(2.746,0.468)
  silkscreen extent -3.5,-1.53 1.85,1.5, body extent -3.85,-1.53 3.15,1.17, height 2.01
RES_0402(1005) [mm] "Chip Inductor, Body 1.0x0.5mm, IPC High Density"
  rect 0.6x0.6 smd: 1(-0.5,0) 2(0.5,0)
  silkscreen extent -1,-0.5 1,0.5, body extent -0.5,-0.25 0.5,0.25, height 0.35
RES_2512 [mm]
  rect 1.5x3.2 smd: 1(-3.2,0) 2(3.2,0)
  silkscreen extent -4.3,-1.9 4.3,1.9, body extent -3.2,-1.6 3.2,1.6, height 0.6
RES_VAR_Type1 [mm] "Bien tro vi chinh"
  oval 1.6x2 hole 0.8: 1(-2.54,0) 2(0,0) 3(2.54,0)
  silkscreen extent -4.47,-2.54 4.6,2.54, body extent -4.54,-2.4 4.66,2.4, height 12.02
SIM_A7677S [mm]
  oval 1.6x0.6 smd: 1(-12,8) 2(-12,7) 3(-12,6) 4(-12,5) 5(-12,4) 6(-12,3) 7(-12,2) 8(-12,1) 9(-12,0) 10(-12,-1) 11(-12,-2) 12(-12,-3) 13(-12,-4) 14(-12,-5) 15(-12,-6) 16(-12,-7) 17(-12,-8) 35(12,-8) 36(12,-7) 37(12,-6) 38(12,-5) 39(12,-4) 40(12,-3) 41(12,-2) 42(12,-1) 43(12,0) 44(12,1) 45(12,2) 46(12,3) 47(12,4) 48(12,5) 49(12,6) 50(12,7) 51(12,8)
  oval 0.6x1.6 smd: 18(-8,-12) 19(-7,-12) 20(-6,-12) 21(-5,-12) 22(-4,-12) 23(-3,-12) 24(-2,-12) 25(-1,-12) 26(0,-12) 27(1,-12) 28(2,-12) 29(3,-12) 30(4,-12) 31(5,-12) 32(6,-12) 33(7,-12) 34(8,-12) 52(8,12) 53(7,12) 54(6,12) 55(5,12) 56(4,12) 57(3,12) 58(2,12) 59(1,12) 60(0,12) 61(-1,12) 62(-2,12) 63(-3,12) 64(-4,12) 65(-5,12) 66(-6,12) 67(-7,12) 68(-8,12) 89(-11.01,-12) 90(-10.01,-12) 91(-9,-12) 92(9,-12) 93(10,-12) 94(11,-12) 95(11,12) 96(10,12) 97(9,12) 98(-9.01,12) 99(-10.01,12) 100(-11.01,12)
  rect 2x2 smd: 69(-7.611,7.6) 70(-7.611,3.8) 71(-7.611,0) 72(-7.611,-3.8) 73(-7.611,-7.6) 74(-3.811,-7.6) 75(-0.011,-7.6) 76(3.789,-7.6) 77(7.589,-7.6) 78(7.589,-3.8) 79(7.589,0) 80(7.589,3.8) 81(7.589,7.6) 82(3.589,7.6) 83(-0.011,7.6) 84(-3.811,7.6) 85(-3.811,0) 86(-0.011,-3.8) 87(3.789,0) 88(-0.011,3.8)
  rect 1x0.8 smd: 101(-9.81,3.5) 102(-9.81,2.1) 103(-9.81,0.7) 104(-9.81,-0.7) 105(-9.81,-2.1) 106(-9.81,-3.5) 113(9.79,-3.5) 114(9.79,-2.1) 115(9.79,-0.7) 116(9.79,0.7) 117(9.79,2.1) 118(9.79,3.5) 125(-9.81,-4.9) 126(-9.81,-6.3) 127(-9.81,-7.7) 128(9.79,-7.7) 129(9.79,-6.3) 130(9.79,-4.9)
  rect 0.8x1 smd: 107(-3.5,-9.8) 108(-2.1,-9.8) 109(-0.7,-9.8) 110(0.7,-9.8) 111(2.1,-9.8) 112(3.5,-9.8) 119(3.5,9.8) 120(2.1,9.8) 121(0.7,9.8) 122(-0.7,9.8) 123(-2.1,9.8) 124(-3.5,9.8)
  silkscreen extent -14.1,-12.07 12.08,12.08, body extent -12.04,-11.94 12.01,12.09, height 1.2
SOT23-3 [mm]
  round 0.5 on Top Overlay: 1(-1.016,0)
  rect 1x1.2 smd: 1(-1,-1.1) 2(1,-1.1) 3(0,1.1)
  silkscreen extent -1.4,-0.38 1.4,1.15, body extent -1.46,-1.17 1.46,1.17, height 1
SOT23-5 [mm]
  rect 0.6x1.524 smd: 1(-0.95,-1.4) 2(0,-1.4) 3(0.95,-1.4) 4(0.95,1.4) 5(-0.95,1.4)
  silkscreen extent -1.5,-0.85 1.5,0.85, body extent -1.46,-1.17 1.46,1.17, height 1
SOT65P210X140-6N [mm] "SOT23, 6-Leads, Body 2.00x2.10mm, Pitch 0.65mm, IPC Medium Density"
  round 0.4 on Top Overlay: 0(-1.4,1.1)
  rect 1.15x0.4 smd: 1(-1.05,0.65) 2(-1.05,0) 3(-1.05,-0.65) 4(1.05,-0.65) 5(1.05,0) 6(1.05,0.65)
  silkscreen extent -1.88,-1.35 1.88,1.35, body extent -1.13,-1 1.13,1, height 1
SPCAP0.22F [mm]
  rect 1.3x2.5 smd: 1(1,0) 2(-1,0)
  silkscreen extent -2.6,1.5 2.4,6.5
"Test Point SMD" [mm]
  round 2 smd: 1(0,0)
TO252 [mm]
  rect 1.5x2.5 smd: 1(-2.3,-5.532) 3(2.3,-5.532)
  rect 7x7 smd: 2(0,1.468)
  silkscreen extent -3.3,-4.19 3.3,-2.2, body extent -3.27,-5.81 3.27,4.13, height 2.41
TO-263-5 [mm]
  rect 1x3.5 smd paste+0 mask+0: 1(-3.4,-4.815) 2(-1.7,-4.815) 3(0,-4.815) 4(1.7,-4.815) 5(3.4,-4.815)
  rect 10.236x8.071 smd paste+0 mask+0: 6(0,4.815)
  silkscreen extent -5.33,-4.93 5.22,0.46, body extent -5.09,-6.19 5.09,8.49, height 4.68
TP [mm] "TestPoint"
  oct 4x4 hole 2: 1(0,0)
TP_2 [mm] "TestPoint"
  rect 3.5x3 hole 2: 1(0,0)
TSOP65P640X120-20N [mm] "TSOP, 20-Leads, Body 6.50x4.40mm, Pitch 0.65mm, IPC Medium Density"
  rect 1.4x0.35 smd: 1(-2.95,2.925) 2(-2.95,2.275) 3(-2.95,1.625) 4(-2.95,0.975) 5(-2.95,0.325) 6(-2.95,-0.325) 7(-2.95,-0.975) 8(-2.95,-1.625) 9(-2.95,-2.275) 10(-2.95,-2.925) 11(2.95,-2.925) 12(2.95,-2.275) 13(2.95,-1.625) 14(2.95,-0.975) 15(2.95,-0.325) 16(2.95,0.325) 17(2.95,0.975) 18(2.95,1.625) 19(2.95,2.275) 20(2.95,2.925)
  silkscreen extent -3.07,-3.3 1.85,3.83, body extent -3.2,-3.25 3.2,3.25, height 1

## Part data
AT500: library part "Antenna GPS Passive", "A25-4102820-AMT23, Antenna GPS 25x25x4mm", MPN=A25-4102820-AMT23
AT700: library part IPEX-AT, "IPEX SMD", MPN=U.FL-R-SMT-1(80)
BT400: library part Battery, LatestRevisionDate=17-Jul-2002, LatestRevisionNote="Re-released for DXP Platform.", PackageDescription="Battery; 2 Leads", PackageReference=BAT-2, Published=24-Mar-1999, Publisher="Altium Limited"
C: library part DCK-3R3E224U-E, Capacitance=220mF, ESR (Equivalent Series Resistance)="200 Ohm", Lifetime @ Temp.="1000 Hrs @ 60°C", MFR="Elna America", Operating Temperature="-10°C ~ 60°C", Package / Case="Coin, Wide Terminals - Opposite Sides", Supplier Part Number 1=604-1007-ND, Tolerance="-20%, +80%", Voltage - Rated=3.3V, Category=Capacitors, ComponentLink1Description=http://media.digikey.com/pdf/Data%20Sheets/Elna%20America%20Inc/DC_DCKe.pdf, ComponentLink1URL=http://media.digikey.com/pdf/Data%20Sheets/Elna%20America%20Inc/DC_DCKe.pdf, Height - Seated (Max)="0.083\" (2.10mm)", LatestRevisionDate=17-Jul-2002, LatestRevisionNote="Re-released for DXP Platform.", Lead Spacing="0.079\" (2.00mm)", Mounting type="Surface Mount", MPN=NC, PackageDescription="Battery; 2 Leads", PackageReference=BAT-2, Packaging=Bulk, Pricing 1="1=1.41, 10=1.114, 25=1.0208, 50=0.9652, 100=0.8352, 250=0.7424, 500=0.63104, 1000=0.5568, 2500=0.51968 (USD)", Published=24-Mar-1999, Publisher="Altium Limited", RoHS="RoHS Compliant", Size / Dimension="0.268\" Dia (6.80mm)", Stock 1=7810, Supplier 1=Digi-Key
C200 C202 C500 C501: library part "Cap Cer 0603 (1608)", "CAP CER 0.1UF 50V X5R 0402", MFR=YAGEO, MPN=CC0402KRX5R9BB104, Category="Ceramic Capacitors", LatestRevisionDate=17-Jul-2002, LatestRevisionNote="Re-released for DXP Platform.", PackageReference=RAD-0.3, Published=8-Jun-2000, Publisher="Altium Limited"
C201: library part CL31A106KOHNNNE, "CAP Ceramic 106/50V 10% 1206", MFR=YAGEO, MPN=NC
C203 C502: library part "Cap Tantal 2312 (6032-28)", "Capacitor Tantalum 100uF/10V 2312(6032-28)", MPN=TPSC107K010R0100
C204: library part UWT1C221MCL1GS, "Capacitor Alum 10uF/50V SMD 5x5.4mm", Capacitance=220µF, ESR (Equivalent Series Resistance)=-, Lifetime @ Temp.="1000 Hrs @ 105°C", Manufacturer=Nichicon, MPN=AVS106M50C12T-F, Operating Temperature="-55°C ~ 105°C", Package / Case="Radial, Can - SMD", Ripple Current=105mA, Supplier Part Number 1=493-2179-1-ND, Tolerance=±20%, Voltage Rating=16V, Category=Capacitors, ComponentLink1Description=http://www.nichicon.co.jp/english/products/pdfs/e-wt.pdf, ComponentLink1URL=http://www.nichicon.co.jp/english/products/pdfs/e-wt.pdf, Features="General Purpose", Height - Seated (Max)="0.303\" (7.70mm)", Impedance=-, Lead Spacing=-, Manufacturer Part Number=UWT1C221MCL1GS, Mounting type="Surface Mount", Packaging="Cut Tape (CT)", Pricing 1="1=0.46, 10=0.366, 100=0.2205, 250=0.16536 (USD)", RoHS="RoHS Compliant", Size / Dimension="0.248\" Dia (6.30mm)", Stock 1=45106, Supplier 1=Digi-Key, Surface Mount Land Size="0.260\" L x 0.260\" W (6.60mm x 6.60mm)"
C205: library part Cap, "CAP CER 0.1UF 50V X5R 0402", MPN=CC0402KRX5R9BB104, LatestRevisionDate=17-Jul-2002, LatestRevisionNote="Re-released for DXP Platform.", PackageReference=RAD-0.3, Published=8-Jun-2000, Publisher="Altium Limited"
C208: library part Cap, "CAP CER 0.1UF 50V X5R 0402", MPN=NC, LatestRevisionDate=17-Jul-2002, LatestRevisionNote="Re-released for DXP Platform.", PackageReference=RAD-0.3, Published=8-Jun-2000, Publisher="Altium Limited"
C209: library part UWT1C221MCL1GS, "Capacitor Tantalum 100uF/10V 2312(6032-28)", Capacitance=220µF, ESR (Equivalent Series Resistance)=-, Lifetime @ Temp.="1000 Hrs @ 105°C", Manufacturer=Nichicon, MPN=NC, Operating Temperature="-55°C ~ 105°C", Package / Case="Radial, Can - SMD", Ripple Current=105mA, Supplier Part Number 1=493-2179-1-ND, Tolerance=±20%, Voltage Rating=6.3V, Category=Capacitors, ComponentLink1Description=http://www.nichicon.co.jp/english/products/pdfs/e-wt.pdf, ComponentLink1URL=http://www.nichicon.co.jp/english/products/pdfs/e-wt.pdf, Features="General Purpose", Height - Seated (Max)="0.303\" (7.70mm)", Impedance=-, Lead Spacing=-, Manufacturer Part Number=UWT1C221MCL1GS, Mounting type="Surface Mount", Packaging="Cut Tape (CT)", Pricing 1="1=0.46, 10=0.366, 100=0.2205, 250=0.16536 (USD)", RoHS="RoHS Compliant", Size / Dimension="0.248\" Dia (6.30mm)", Stock 1=45106, Supplier 1=Digi-Key, Surface Mount Land Size="0.260\" L x 0.260\" W (6.60mm x 6.60mm)"
C400 C401: library part "Cap Cer 0603 (1608)", "CAP CER 20PF 50V C0G/NP0 0402", MPN=CQ0402FRNPO9BN200, LatestRevisionDate=17-Jul-2002, LatestRevisionNote="Re-released for DXP Platform.", PackageReference=RAD-0.3, Published=8-Jun-2000, Publisher="Altium Limited"
C402 C405 C406 C407: library part C0603C104K5RACTU, "CAP CER 0.1UF 50V X5R 0402", MPN=CC0402KRX5R9BB104, Category=CAPACITOR, CompanyID=VT-00982, Solder=SMT
C403: library part "Cap Cer 0603 (1608)", "CAP CER 10PF 50V C0G/NP0 0402", MPN=CC0402JRNPO9BN100, LatestRevisionDate=17-Jul-2002, LatestRevisionNote="Re-released for DXP Platform.", PackageReference=RAD-0.3, Published=8-Jun-2000, Publisher="Altium Limited"
C404: library part "Cap Cer 0603 (1608)", "Capacitor Ceramic 10pF/50V 10% 0603", MPN=CC0402JRNPO9BN100, LatestRevisionDate=17-Jul-2002, LatestRevisionNote="Re-released for DXP Platform.", PackageReference=RAD-0.3, Published=8-Jun-2000, Publisher="Altium Limited"
C600 C602: library part "Cap Tantal 2917 (7343-31)", "Capacitor Alum 10uF/50V SMD 5x5.4mm", MPN=AVS106M50C12T-F
C601: library part "Cap Cer 0805 (2012)", "CAP CER 0.1UF 50V X5R 0402", MPN=CC0402KRX5R9BB104, LatestRevisionDate=17-Jul-2002, LatestRevisionNote="Re-released for DXP Platform.", PackageReference=RAD-0.3, Published=8-Jun-2000, Publisher="Altium Limited"
C603 C801 C803 C900: library part "Cap Cer 0603 (1608)", "CAP CER 0.1UF 50V X5R 0402", MPN=CC0402KRX5R9BB104, LatestRevisionDate=17-Jul-2002, LatestRevisionNote="Re-released for DXP Platform.", PackageReference=RAD-0.3, Published=8-Jun-2000, Publisher="Altium Limited"
C700: library part CC0402FRNPO9BN101, "CAP CER 100PF 50V C0G/NPO 0402", MFR=YAGEO, MPN=CC0402JRNPO9BN101, Category="Ceramic Capacitors"
C701 C706: library part CC0603KPX7R9BB104, "CAP CER 0.1UF 50V X5R 0402", MFR=YAGEO, MPN=CC0402KRX5R9BB104, Category="Ceramic Capacitors", Value1=NC
C702: library part UWT1C221MCL1GS, "470 µF Molded Tantalum Capacitors 10 V 2917 (7343 Metric) 100mOhm", Capacitance=220µF, ESR (Equivalent Series Resistance)=-, Lifetime @ Temp.="1000 Hrs @ 105°C", MFR=Nichicon, Operating Temperature="-55°C ~ 105°C", Package / Case="Radial, Can - SMD", Ripple Current=105mA, Supplier Part Number 1=493-2179-1-ND, Tolerance=±20%, Voltage Rating=16V, Category="Tantalum Capacitors", ComponentLink1Description=http://www.nichicon.co.jp/english/products/pdfs/e-wt.pdf, ComponentLink1URL=http://www.nichicon.co.jp/english/products/pdfs/e-wt.pdf, Features="General Purpose", Height - Seated (Max)="0.303\" (7.70mm)", Impedance=-, Lead Spacing=-, Mounting type="Surface Mount", MPN=UWT1C221MCL1GS, Packaging="Cut Tape (CT)", Pricing 1="1=0.46, 10=0.366, 100=0.2205, 250=0.16536 (USD)", RoHS="RoHS Compliant", Size / Dimension="0.248\" Dia (6.30mm)", Stock 1=45106, Supplier 1=Digi-Key, Surface Mount Land Size="0.260\" L x 0.260\" W (6.60mm x 6.60mm)", Value1=NC
C703: library part C0603C104K5RACTU, "Tụ Ceramic 104/50V 10% 0603", MFR=YAGEO, MPN=CC0603KPX7R9BB104, Category="Ceramic Capacitors", CompanyID=VT-00982, Solder=SMT, Value1=NC
C704 C705: library part Cap, "CAP CER 0.1UF 50V X5R 0402", MFR=YAGEO, MPN=CC0402KRX5R9BB104, Category="Ceramic Capacitors", LatestRevisionDate=17-Jul-2002, LatestRevisionNote="Re-released for DXP Platform.", PackageReference=RAD-0.3, Published=8-Jun-2000, Publisher="Altium Limited"
C707 C708 C709: library part CC0402GRNPO9BN200, "CAP CER 20PF 50V C0G/NPO 0402", MFR=YAGEO, Category="Ceramic Capacitors", MPN=CC0402GRNPO9BN200, Value1=NC
C802: library part Cap, "CAP Ceramic 106/50V 10% 1206", MPN=CL31A106KOHNNNE, LatestRevisionDate=17-Jul-2002, LatestRevisionNote="Re-released for DXP Platform.", PackageReference=RAD-0.3, Published=8-Jun-2000, Publisher="Altium Limited"
D200: library part "Diode B340A", "Diode Schottky 3A/40V DO-214AB", MFR="Diodes Incorporated", MPN=B360A-13-F, Category="Diodes - Rectifiers - Single", Code_JEDEC=DO-214-AA, LatestRevisionDate=17-Jul-2002, LatestRevisionNote="Re-released for DXP Platform.", PackageReference=SMB, Published=8-Jun-2000, Publisher="Altium Limited"
D400: library part "LED 3mm", "LED RED SMD 0402", MPN=NCD0603R1
D500: library part "Diode F03", "1N4148 T4 SOD-123/1206 1N4148W", MFR=LinhKienChatLuong, Category=Diode, MPN=1N4148W
D600: library part "Diode B340A", "Diode Schottky 5A/40V DO-214AB", Code_JEDEC=DO-214-AA, LatestRevisionDate=17-Jul-2002, LatestRevisionNote="Re-released for DXP Platform.", MPN=SS54, PackageReference=SMB, Published=8-Jun-2000, Publisher="Altium Limited"
D800 D900 D901 D902 D903 D904 D905 D906: library part "Diode B340A", "Diode Schottky 3A/40V DO-214AB", MPN=B360A-13-F, Code_JEDEC=DO-214-AA, LatestRevisionDate=17-Jul-2002, LatestRevisionNote="Re-released for DXP Platform.", PackageReference=SMB, Published=8-Jun-2000, Publisher="Altium Limited"
F200: library part RKEF110, "PTC RESET FUSE 33V 1A SMD 1812", MFR="Littelfuse Inc.", MPN=RKEF110, Solder=WAVE
H700: library part MUP-C792, "MicroSIM card SMD SIM Card Connectors ROHS", MFR=MUP, MPN=MUP-C792-3, Value1=NC
IC: "XL6019E1 IC Boost 5A TO-263-5", MPN=XL6019E1
IC200: library part RY81020, "100V@2A Async Step-Down Converter", MFR=RYCHIP, MPN=RY81020BP8
IC700: library part SIMCOM_A7677S, Value1=NC
L200: library part Inductor, "Inductor SMD 3.3uH CD43-3R3 3.5*3*2.1mm", MPN=XRCD43-3R3M, Published=8-Jun-2000, Publisher="Altium Limited", Revision="July-2002: Re-released for DXP Platform."
L201: library part "Inductor Iron", "Inductor 10uH 7x7x4mm", MPN=YPRH0704-100M, LatestRevisionDate=17-Jul-2002, LatestRevisionNote="Re-released for DXP Platform.", PackageReference=AXIAL-0.9, Published=24-Mar-1999, Publisher="Altium Limited"
L202: library part CBC2012T470M, "Inductor Ferrites 4A SMD 0603", Current - Saturation=120mA, Current Rating=150mA, DC Resistance (DCR)="7.54 Ohm Max", Frequency - Self Resonant=11MHz, Frequency - Test=2.52MHz, Inductance=200nH, Manufacturer="Taiyo Yuden", MPN=NC, Operating Temperature="-40°C ~ 105°C", Package / Case="0805 (2012 Metric)", Q @ Freq=-, Supplier Part Number 1=587-1605-1-ND, Tolerance=±20%, Category="Inductors, Coils, Chokes", ComponentLink1Description=http://www.yuden.co.jp/ut/product/category/inductor/CBC2012T470M.pdf, ComponentLink1URL=http://www.yuden.co.jp/ut/product/category/inductor/CBC2012T470M.pdf, Manufacturer Part Number=CBC2012T470M, Material - Core=-, Mounting type="Surface Mount", Packaging="Cut Tape (CT)", Pricing 1="1=0.2, 10=0.188, 50=0.1762, 100=0.1645, 500=0.12926, 1000=0.10575 (USD)", RoHS="RoHS Compliant", Shielding=Unshielded, Size / Dimension="0.079\" L x 0.049\" W x 0.049\" H (2.00mm x 1.25mm x 1.25mm)", Stock 1=108934, Supplier 1=Digi-Key, Type=-
L203: library part CBC2012T470M, "Inductor Ferrites 4A SMD 0603", Current - Saturation=120mA, Current Rating=150mA, DC Resistance (DCR)="7.54 Ohm Max", Frequency - Self Resonant=11MHz, Frequency - Test=2.52MHz, Inductance=200nH, Manufacturer="Taiyo Yuden", Operating Temperature="-40°C ~ 105°C", Package / Case="0805 (2012 Metric)", Q @ Freq=-, Supplier Part Number 1=587-1605-1-ND, Tolerance=±20%, Category="Inductors, Coils, Chokes", ComponentLink1Description=http://www.yuden.co.jp/ut/product/category/inductor/CBC2012T470M.pdf, ComponentLink1URL=http://www.yuden.co.jp/ut/product/category/inductor/CBC2012T470M.pdf, Manufacturer Part Number=CBC2012T470M, Material - Core=-, Mounting type="Surface Mount", MPN=FBMJ1608HM230NT, Packaging="Cut Tape (CT)", Pricing 1="1=0.2, 10=0.188, 50=0.1762, 100=0.1645, 500=0.12926, 1000=0.10575 (USD)", RoHS="RoHS Compliant", Shielding=Unshielded, Size / Dimension="0.079\" L x 0.049\" W x 0.049\" H (2.00mm x 1.25mm x 1.25mm)", Stock 1=108934, Supplier 1=Digi-Key, Type=-
L501: library part FBMJ1608HM230NT, "Inductor Ferrites 4A SMD 0603", MFR="Taiyo Yuden", Category="Ferrite Beads and Chips", MPN=FBMJ1608HM230NT
L502: library part CBC2012T470M, "47nH", Current - Saturation=120mA, Current Rating=150mA, DC Resistance (DCR)="7.54 Ohm Max", Frequency - Self Resonant=11MHz, Frequency - Test=2.52MHz, Inductance=200nH, Manufacturer="Taiyo Yuden", Operating Temperature="-40°C ~ 105°C", Package / Case="0805 (2012 Metric)", Q @ Freq=-, Supplier Part Number 1=587-1605-1-ND, Tolerance=±20%, Category="Inductors, Coils, Chokes", ComponentLink1Description=http://www.yuden.co.jp/ut/product/category/inductor/CBC2012T470M.pdf, ComponentLink1URL=http://www.yuden.co.jp/ut/product/category/inductor/CBC2012T470M.pdf, Manufacturer Part Number=CBC2012T470M, Material - Core=-, Mounting type="Surface Mount", MPN=NC, Packaging="Cut Tape (CT)", Pricing 1="1=0.2, 10=0.188, 50=0.1762, 100=0.1645, 500=0.12926, 1000=0.10575 (USD)", RoHS="RoHS Compliant", Shielding=Unshielded, Size / Dimension="0.079\" L x 0.049\" W x 0.049\" H (2.00mm x 1.25mm x 1.25mm)", Stock 1=108934, Supplier 1=Digi-Key, Type=-
L601: library part CBC2012T470M, "INDUCTOR 4.7uH SMD CDRH127-4R7", Current - Saturation=120mA, Current Rating=150mA, DC Resistance (DCR)="7.54 Ohm Max", Frequency - Self Resonant=11MHz, Frequency - Test=2.52MHz, Inductance=47uH, Manufacturer="Taiyo Yuden", MPN=CDRH127, Operating Temperature="-40°C ~ 105°C", Package / Case="0805 (2012 Metric)", Q @ Freq=-, Supplier Part Number 1=587-1605-1-ND, Tolerance=±20%, Category="Inductors, Coils, Chokes", ComponentLink1Description=http://www.yuden.co.jp/ut/product/category/inductor/CBC2012T470M.pdf, ComponentLink1URL=http://www.yuden.co.jp/ut/product/category/inductor/CBC2012T470M.pdf, Manufacturer Part Number=CBC2012T470M, Material - Core=-, Mounting type="Surface Mount", Packaging="Cut Tape (CT)", Pricing 1="1=0.2, 10=0.188, 50=0.1762, 100=0.1645, 500=0.12926, 1000=0.10575 (USD)", RoHS="RoHS Compliant", Shielding=Unshielded, Size / Dimension="0.079\" L x 0.049\" W x 0.049\" H (2.00mm x 1.25mm x 1.25mm)", Stock 1=108934, Supplier 1=Digi-Key, Type=-
L700 L701: library part CBC2012T470M, "INDUCTOR 200nH 20% 0805 SMD", Current - Saturation=120mA, Current Rating=150mA, DC Resistance (DCR)="7.54 Ohm Max", Frequency - Self Resonant=11MHz, Frequency - Test=2.52MHz, Inductance=200nH, MFR="Taiyo Yuden", Operating Temperature="-40°C ~ 105°C", Package / Case="0805 (2012 Metric)", Q @ Freq=-, Supplier Part Number 1=587-1605-1-ND, Tolerance=±20%, Category="Inductors, Coils, Chokes", ComponentLink1Description=http://www.yuden.co.jp/ut/product/category/inductor/CBC2012T470M.pdf, ComponentLink1URL=http://www.yuden.co.jp/ut/product/category/inductor/CBC2012T470M.pdf, Material - Core=-, Mounting type="Surface Mount", MPN=CBC2012T470M, Packaging="Cut Tape (CT)", Pricing 1="1=0.2, 10=0.188, 50=0.1762, 100=0.1645, 500=0.12926, 1000=0.10575 (USD)", RoHS="RoHS Compliant", Shielding=Unshielded, Size / Dimension="0.079\" L x 0.049\" W x 0.049\" H (2.00mm x 1.25mm x 1.25mm)", Stock 1=108934, Supplier 1=Digi-Key, Type=-, Value1=NC
MD500: "Compact GNSS Module", MPN=LC76G
P100: "Header, 4-Pin, Dual row", LatestRevisionDate=17-Jul-2002, LatestRevisionNote="Re-released for DXP Platform.", Publisher="Altium Limited"
P300: library part "Header 3", "Diode Infrared Receiver 38Khz", MPN=VS18388, LatestRevisionDate=17-Jul-2002, LatestRevisionNote="Re-released for DXP Platform.", Publisher="Altium Limited"
P600 P800: library part "Header 2", "Header, 2-Pin", LatestRevisionDate=17-Jul-2002, LatestRevisionNote="Re-released for DXP Platform.", Publisher="Altium Limited"
  P600: MPN=NC
P601 P602: library part "Header 2", "Header, 2-Pin", MPN=NC, LatestRevisionDate=17-Jul-2002, LatestRevisionNote="Re-released for DXP Platform.", Publisher="Altium Limited"
P700: library part USB-M, Value1=NC
Q700: library part 2N3906, "PNP General Purpose Amplifier", MFR="Alpha & Omega Semiconductor Inc.", MPN=AO3415, Category="Transistors - FETs, MOSFETs - Single", ComponentLink1Description="Manufacturer Link", ComponentLink1URL=http://www.fairchildsemi.com/, ComponentLink2Description=Datasheet, ComponentLink2URL=http://www.fairchildsemi.com/ds/2N%2F2N3906.pdf, DatasheetVersion=1997, LatestRevisionDate=15-Jan-2003, LatestRevisionNote="PCB Footprint 'BCY-W3/D4.7' replaced", PackageDescription="TO, Flat Index; 3 In-Line, Axial Leads; Body Dia. 4.5mm; Leads 0.51 x 0.48 mm (max)", PackageReference=TO-92A, PackageVersion=Sep-1998, Published=8-Jun-2000, Publisher="Altium Limited", Value1=NC
Q701: library part 2N3904, "http://linhkienchatluong.vn/transistor/c1815-hf-npn-transistor-015a-60v-sot-23-loai-thuong_sp787_ct2573.aspx", MFR=LinhKienChatLuong, MPN=CL00356, Category="Transistor NPN", ComponentLink1Description="Manufacturer Link", ComponentLink1URL=http://www.fairchildsemi.com/, ComponentLink2Description=Datasheet, ComponentLink2URL=http://www.fairchildsemi.com/ds/2N%2F2N3904.pdf, DatasheetVersion=1997, LatestRevisionDate=15-Jan-2003, LatestRevisionNote="PCB Footprint 'BCY-W3/D4.7' replaced", PackageDescription="TO, Flat Index; 3 In-Line, Axial Leads; Body Dia. 4.5mm; Leads 0.51 x 0.48 mm (max)", PackageReference=TO-92A, PackageVersion=Sep-1998, Published=8-Jun-2000, Publisher="Altium Limited", Value1=NC
R100 R102 R404 R604: library part Res1, "RES 1K OHM 1% 1/8W 0402", MPN=RC0402FR-071KL, LatestRevisionDate=17-Jul-2002, LatestRevisionNote="Re-released for DXP Platform.", PackageReference=AXIAL-0.3, Published=8-Jun-2000, Publisher="Altium Limited"
R101 R103 R402: library part Res1, "Resistor", LatestRevisionDate=17-Jul-2002, LatestRevisionNote="Re-released for DXP Platform.", PackageReference=AXIAL-0.3, Published=8-Jun-2000, Publisher="Altium Limited"
R200 R201: library part Res1, LatestRevisionDate=17-Jul-2002, LatestRevisionNote="Re-released for DXP Platform.", MPN=NC, PackageReference=AXIAL-0.3, Published=8-Jun-2000, Publisher="Altium Limited"
R202: library part Res1, "RES 20K OHM 5% 1/8W 0402", MFR="Stackpole Electronics Inc", MPN=AC0402FR-0720KL, Category="Chip Resistor - Surface Mount", LatestRevisionDate=17-Jul-2002, LatestRevisionNote="Re-released for DXP Platform.", PackageReference=AXIAL-0.3, Published=8-Jun-2000, Publisher="Altium Limited"
R203: library part Res1, "RES 5.1K OHM 5% 1/8W 0402", MFR="Stackpole Electronics Inc", MPN=AC0402FR-075K1L, Category="Chip Resistor - Surface Mount", LatestRevisionDate=17-Jul-2002, LatestRevisionNote="Re-released for DXP Platform.", PackageReference=AXIAL-0.3, Published=8-Jun-2000, Publisher="Altium Limited"
R204: library part Res1, "RES 200K OHM 5% 1/8W 0402", MFR=YAGEO, MPN=RC0402FR-07200KL, Category="Chip Resistor - Surface Mount", LatestRevisionDate=17-Jul-2002, LatestRevisionNote="Re-released for DXP Platform.", PackageReference=AXIAL-0.3, Published=8-Jun-2000, Publisher="Altium Limited"
R300: library part Res1, "RES 10K OHM 5% 1/8W 0402", MFR=Yageo, MPN=RC0402JR-0710KL, LatestRevisionDate=17-Jul-2002, LatestRevisionNote="Re-released for DXP Platform.", PackageReference=AXIAL-0.3, Published=8-Jun-2000, Publisher="Altium Limited"
R301: library part Res1, "RES 100 OHM 1% 1/8W 0402", MPN=RC0402FR-7W100RL, LatestRevisionDate=17-Jul-2002, LatestRevisionNote="Re-released for DXP Platform.", PackageReference=AXIAL-0.3, Published=8-Jun-2000, Publisher="Altium Limited"
R400 R401 R405 R607: library part Res1, "Resistor 100K 1/8W 1% 0402", MPN=RC0402FR-07100KL, LatestRevisionDate=17-Jul-2002, LatestRevisionNote="Re-released for DXP Platform.", PackageReference=AXIAL-0.3, Published=8-Jun-2000, Publisher="Altium Limited"
R403: library part Res1, "RES 0 OHM 1/8W 0402", MPN=CRCW04020000Z0EDC, LatestRevisionDate=17-Jul-2002, LatestRevisionNote="Re-released for DXP Platform.", PackageReference=AXIAL-0.3, Published=8-Jun-2000, Publisher="Altium Limited"
R500 R501: library part RC0402FR-071KL, "Resistors - SMD 1 kOhms 62.5mW 0402 1%", MFR=YAGEO, MPN=RC0402FR-131KL, Power Rating=1/16W, Tolerance=1%, Voltage Rating=50V, Category=0402
R502: library part Res1, "RES 100 OHM 1% 1/8W 0402", MFR="Vishay Dale", MPN=RC0402FR-7W100RL, Category="Chip Resistor - Surface Mount", LatestRevisionDate=17-Jul-2002, LatestRevisionNote="Re-released for DXP Platform.", PackageReference=AXIAL-0.3, Published=8-Jun-2000, Publisher="Altium Limited"
R503: library part RC0402JR-0710KL, "RES 10K OHM 5% 1/8W 0402", MFR=YAGEO, Category="Chip Resistor - Surface Mount", MPN=RC0402JR-0710KL
R600 R601 R602 R605 R803 R804 R806 R901: library part Res1, "RES 10K OHM 5% 1/8W 0402", MPN=RC0402JR-0710KL, LatestRevisionDate=17-Jul-2002, LatestRevisionNote="Re-released for DXP Platform.", PackageReference=AXIAL-0.3, Published=8-Jun-2000, Publisher="Altium Limited"
R603: library part "Res 1W", "Resistor 1W 0.1R 1% SMD 2512"
R606: library part Res1, "RES 330 OHM 1% 1/8W 0402", MPN=RC0402FR-07330RL, LatestRevisionDate=17-Jul-2002, LatestRevisionNote="Re-released for DXP Platform.", PackageReference=AXIAL-0.3, Published=8-Jun-2000, Publisher="Altium Limited"
R700: library part RT0603BRD071KL, MFR=YAGEO, MPN=RC0402FR-131KL, Category="Chip Resistor - Surface Mount"
R701 R702 R703 R704: library part RC0402JR-072K2L, "RES 2.2K OHM 1/8W 0402", MFR=YAGEO, Category="Chip Resistor - Surface Mount", MPN=RC0402JR-072K2L, Value1=NC
R705: library part Res1, "Trở 10K 1/8W 1% 0603", MFR=YAGEO, MPN=RT0603DRD0710KL, Category="Chip Resistor - Surface Mount", LatestRevisionDate=17-Jul-2002, LatestRevisionNote="Re-released for DXP Platform.", PackageDescription="Axial Device, Thru-Hole; 2 Leads; 0.3 in Pin Spacing", PackageReference=AXIAL-0.3, Published=8-Jun-2000, Publisher="Altium Limited", Value1=NC
R706 R708 R710: library part Res1, "Trở 1K 1/8W 1% 0603", MFR=YAGEO, MPN=RT0603BRD071KL, Category="Chip Resistor - Surface Mount", LatestRevisionDate=17-Jul-2002, LatestRevisionNote="Re-released for DXP Platform.", PackageDescription="Axial Device, Thru-Hole; 2 Leads; 0.3 in Pin Spacing", PackageReference=AXIAL-0.3, Published=8-Jun-2000, Publisher="Altium Limited", Value1=NC
R707 R709 R711: library part Res1, "Trở 4.7K 1/8W 1% 0603", MFR=YAGEO, MPN=RC0603JR-074K7L, Category="Chip Resistor - Surface Mount", LatestRevisionDate=17-Jul-2002, LatestRevisionNote="Re-released for DXP Platform.", PackageDescription="Axial Device, Thru-Hole; 2 Leads; 0.3 in Pin Spacing", PackageReference=AXIAL-0.3, Published=8-Jun-2000, Publisher="Altium Limited", Value1=NC
R712 R713 R714 R715: library part RC0402FR-070RL, "RES 0 OHM JUMPER 1/16W 0402", MFR=YAGEO, Category="Chip Resistor - Surface Mount", MPN=RC0402FR-070RL, Value1=NC
R716: library part RC0402JR-074K7P, "RES SMD 4.7K OHM 5% 1/16W 0402", MFR=YAGEO, Category="Chip Resistor - Surface Mount", MPN=RC0402JR-074K7P, Value1=NC
R800 R802 R900: library part Res1, "Resistor 100K 1/8W 1% 0402", MPN=RC0402JR-07100KL, LatestRevisionDate=17-Jul-2002, LatestRevisionNote="Re-released for DXP Platform.", PackageReference=AXIAL-0.3, Published=8-Jun-2000, Publisher="Altium Limited"
R801: library part Res1, "RES 10K OHM 5% 1/8W 0402", LatestRevisionDate=17-Jul-2002, LatestRevisionNote="Re-released for DXP Platform.", PackageReference=AXIAL-0.3, Parameter 1=RC0402JR-0710KL, Published=8-Jun-2000, Publisher="Altium Limited"
R805: library part Res1, "Resistor 1K 1/8W 1% 0603", LatestRevisionDate=17-Jul-2002, LatestRevisionNote="Re-released for DXP Platform.", PackageReference=AXIAL-0.3, Published=8-Jun-2000, Publisher="Altium Limited"
R902 R903 R905: library part Res1, "10 kOhms ±0.5% 0.1W, 1/10W Chip Resistor 0603 (1608 Metric) Thin Film", MFR=YAGEO, MPN=RT0603DRD0710KL, Category="Chip Resistor - Surface Mount", LatestRevisionDate=17-Jul-2002, LatestRevisionNote="Re-released for DXP Platform.", PackageDescription="Axial Device, Thru-Hole; 2 Leads; 0.3 in Pin Spacing", PackageReference=AXIAL-0.3, Published=8-Jun-2000, Publisher="Altium Limited"
RV600 RV900: library part Res_Vol_Single, "Volume Varistor Single 200K", LatestRevisionDate=17-Jul-2002, LatestRevisionNote="Re-released for DXP Platform.", PackageReference=VR5, Published=8-Jun-2000, Publisher="Altium Limited", Set Position=0.5, Sim Note="Enter the Resistance value and the set point into parameter fields."
T500: "Mosfet P Channel", Category="Transistor PNP", MPN=A03415
T600 T800: library part AOD4185, "MOSFET P-CH 60V 26A TO252", Current - Continuous Drain (Id) @ 25° C="3.7A (Ta)", Drain to Source Voltage (Vdss)=20V, Input Capacitance (Ciss) @ Vds="633pF @ 10V", Manufacturer="International Rectifier", Package / Case="TO-236-3, SC-59, SOT-23-3", Power - Max=1.3W, Supplier Device Package=Micro3™/SOT-23, Supplier Part Number 1=IRLML6402GTRPBFDKR-ND, Category="Discrete Semiconductor Products", ComponentLink1Description=http://www.irf.com/product-info/datasheets/data/irlml6402gpbf.pdf, ComponentLink1URL=http://www.irf.com/product-info/datasheets/data/irlml6402gpbf.pdf, FET Feature="Logic Level Gate", FET Type="MOSFET P-Channel, Metal Oxide", Gate Charge (Qg) @ Vgs="12nC @ 5V", Mounting type="Surface Mount", MPN=AOD409, Packaging=Digi-Reel®, Pricing 1="1=0.6, 10=0.34, 25=0.2932, 50=0.2468, 100=0.2209, 250=0.20072, 500=0.18058, 1000=0.16904 (USD)", Rds On (Max) @ Id, Vgs="65 mOhm @ 3.7A, 4.5V", RoHS="RoHS Compliant", Stock 1=4068, Supplier 1=Digi-Key, Vgs(th) (Max) @ Id="1.2V @ 250µA"
T601: library part 2SC1815-HF, "Trans C1815 NPN 0.15A/50V SMD SOT23", MPN=2SC1815
T700 T701: library part 2SC1815-HF, "http://linhkienchatluong.vn/transistor/c1815-hf-npn-transistor-015a-60v-sot-23-loai-thuong_sp787_ct2573.aspx", MFR=LinhKienChatLuong, MPN=CL00356, Value1=NC
  T700: Parameter 2="Transistor NPN"
  T701: Category="Transistor NPN"
T801: library part 2SC1815-HF, "Transistor  50V 150mA  NPN SMD SOT-23", MPN=2SC1815
T906: "MOSFET N-CH 60V 300MA SOT-23", MFR="Discrete Semiconductor Products", Category="Mosfet N-Channel", MPN=2N7002,215
U202: library part TLV1117LV33DCYR, "800mA and 1A Low Dropout Positive Regulator 3.3V", MPN=NC